# Altium PCB 24V-70A-Power-Board-v2.0.PcbDoc (part 6 of 9)
Units mm, origin at the board's own origin, x right, y up, seen from the top; angles counter-clockwise.
Board outline 350 x 215 mm, 2 copper layers (Top Layer, Bottom Layer), stack 1.64 mm thick; 337 components, 182 nets, 856 pads, 561 vias.
Unrouted connection lines stored in the file: 58.
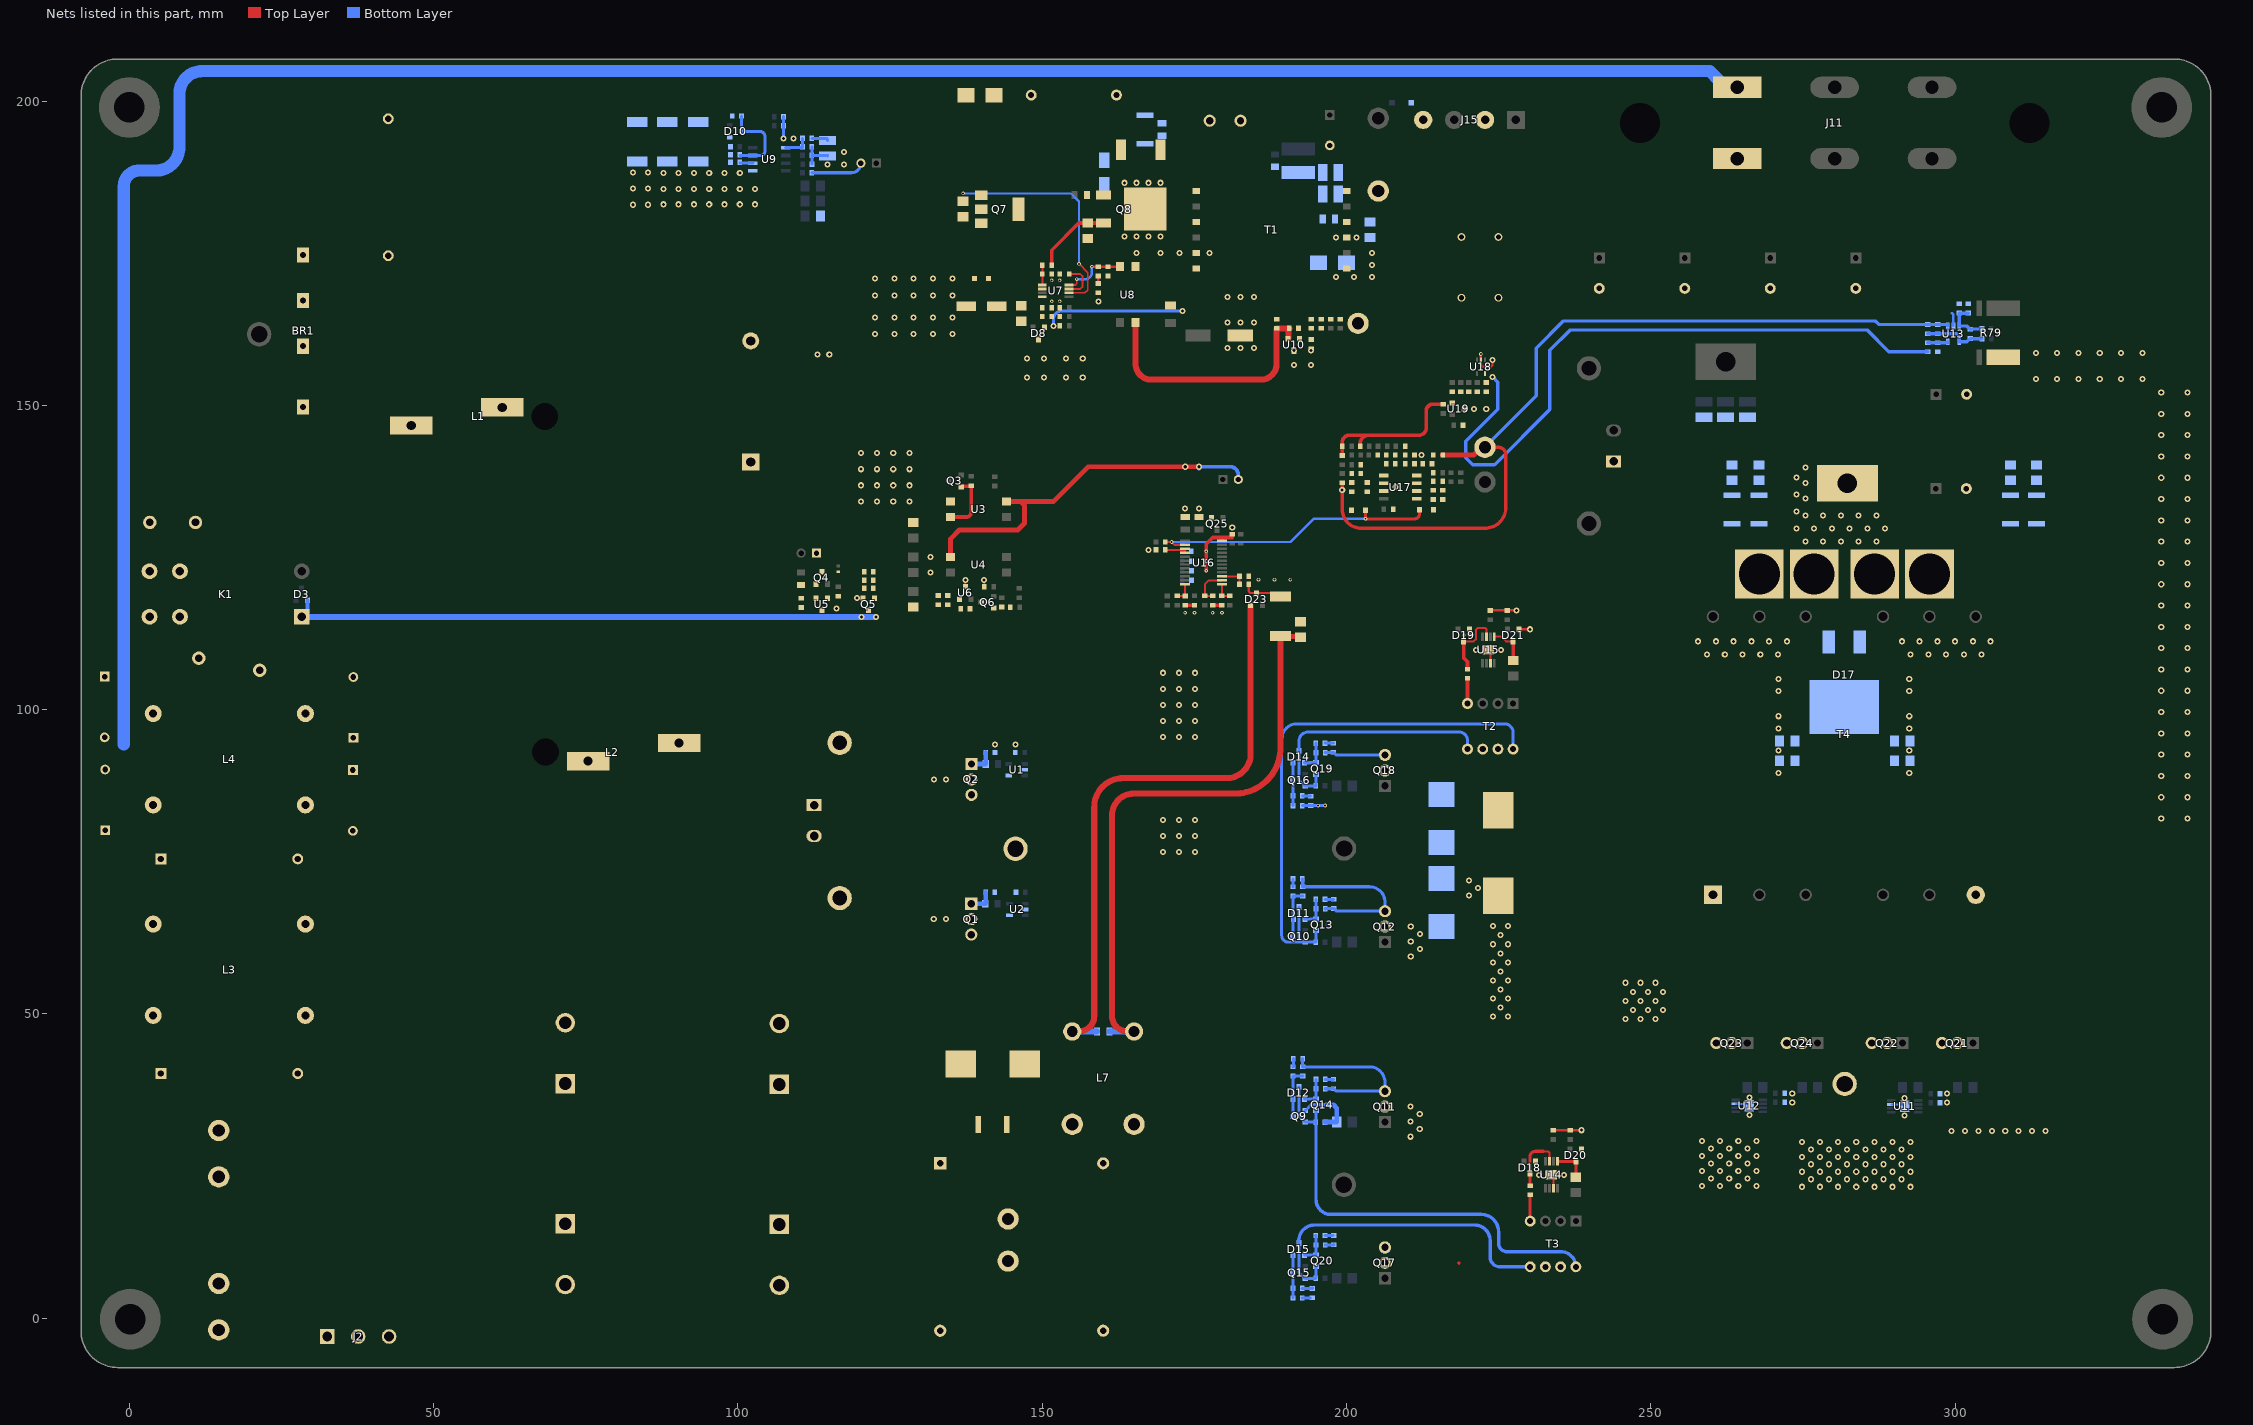
[diagram p2: the nets of this part, all layers, seen from the top]

## Part data (continued)
R103: library part RC1206JR-070RL, "RES 0 OHM JUMPER 1/4W 1206", Case Code (Imperial)=1206, Case Code (Metric)=3216, Manufacturer=Yageo, Max Operating Temperature=155°C, Max Power Dissipation=250mW, Min Operating Temperature=-55°C, Package Quantity=1, Resistance Tolerance=5%, Resistor Type="Thick Film,Carbon Film", Supplier Part Number=1414689, Temperature Coefficient=200ppm/°C, Voltage Rating=200V, Case/Package=1206, ComponentLink1Description=https://datasheet.ciiva.com/11808/0900766b80c6630a-11808156.pdf?src-supplier=Rs, ComponentLink1URL=https://datasheet.ciiva.com/11808/0900766b80c6630a-11808156.pdf?src-supplier=Rs, ComponentLink2Description=https://datasheet.ciiva.com/29181/402222-da-01-en-smd-widerstand-0-ohm-1206-29181568.pdf?src-supplier=Conrad, ComponentLink2URL=https://datasheet.ciiva.com/29181/402222-da-01-en-smd-widerstand-0-ohm-1206-29181568.pdf?src-supplier=Conrad, ComponentLink3Description=https://datasheet.ciiva.com/7983/444357-7983807.pdf?src-supplier=Element14, ComponentLink3URL=https://datasheet.ciiva.com/7983/444357-7983807.pdf?src-supplier=Element14, ComponentLink4Description=https://datasheet.ciiva.com/22747/1692832-22747541.pdf?src-supplier=Element14, ComponentLink4URL=https://datasheet.ciiva.com/22747/1692832-22747541.pdf?src-supplier=Element14, ComponentLink5Description=https://datasheet.ciiva.com/46445/444357-46445719.pdf?src-supplier=Element14, ComponentLink5URL=https://datasheet.ciiva.com/46445/444357-46445719.pdf?src-supplier=Element14, ComponentLink6Description=https://datasheet.ciiva.com/2458/pyu-rc1206-51-rohs-l-4-2458669.pdf?src-supplier=Digikey, ComponentLink6URL=https://datasheet.ciiva.com/2458/pyu-rc1206-51-rohs-l-4-2458669.pdf?src-supplier=Digikey, ComponentLink7Description=https://datasheet.ciiva.com/2458/pyu-rc1206-51-rohs-l-4-2458670.pdf?src-supplier=Digikey, ComponentLink7URL=https://datasheet.ciiva.com/2458/pyu-rc1206-51-rohs-l-4-2458670.pdf?src-supplier=Digikey, ComponentLink8Description=https://datasheet.ciiva.com/2458/pyu-rc1206-51-rohs-l-4-2458668.pdf?src-supplier=Digikey, ComponentLink8URL=https://datasheet.ciiva.com/2458/pyu-rc1206-51-rohs-l-4-2458668.pdf?src-supplier=Digikey, ComponentLink9Description=https://datasheet.ciiva.com/7857/1692832-7857422.pdf?src-supplier=Element14, ComponentLink9URL=https://datasheet.ciiva.com/7857/1692832-7857422.pdf?src-supplier=Element14, ComponentLink10Description=https://datasheet.ciiva.com/7857/1692832-7857421.pdf?src-supplier=Element14, ComponentLink10URL=https://datasheet.ciiva.com/7857/1692832-7857421.pdf?src-supplier=Element14, ComponentLink11Description=https://datasheet.ciiva.com/17035/pyu-rc1206-51-rohs-l-4-17035512.pdf?src-supplier=Future+Electronics, ComponentLink11URL=https://datasheet.ciiva.com/17035/pyu-rc1206-51-rohs-l-4-17035512.pdf?src-supplier=Future+Electronics, Contact Plating=Tin,Matte, Depth=1.6mm, Features="Moisture Resistant", Height=0.026inch, Item Type=Resistors, Lead Free=5697LeadFree, Length=0.122inch, Manufacturer Part Number=RC1206JR-070RL, Number of Terminations=2, Packaging="Tape and Reel", Power Rating=250mW, Pricing="5000=0.0025, 15000=0.0039, 25000=0.0023, 50000=0.0037, 100000=0.0022, 200000=0.0035, 250000=0.0021, 625000=0.002 (USD)", Reach SVHC Compliant=Unknown, RoHS=Yes, RoHS Compliant=Yes, Series=RC, Stock=1115000, Supplier="Future Electronics", Technology="THICK FILM", Termination=SMD/SMT, Tolerance=5%, Width=0.063inch
R104: library part CRCW060360K4FKEA, "RES SMD 60.4K OHM 1% 1/10W 0603", LCSC Part Number=C844800, Manufacturer=Vishay, Voltage Rating (DC)=75V, ComponentLink1Description=https://datasheet.ciiva.com/11809/0900766b80d98afc-11809685.pdf?src-supplier=Rs, ComponentLink1URL=https://datasheet.ciiva.com/11809/0900766b80d98afc-11809685.pdf?src-supplier=Rs, ComponentLink2Description=https://datasheet.ciiva.com/2494/dcrcwe3-2494471.pdf?src-supplier=Digikey, ComponentLink2URL=https://datasheet.ciiva.com/2494/dcrcwe3-2494471.pdf?src-supplier=Digikey, ComponentLink3Description=https://datasheet.ciiva.com/2494/dcrcwe3-2494472.pdf?src-supplier=Digikey, ComponentLink3URL=https://datasheet.ciiva.com/2494/dcrcwe3-2494472.pdf?src-supplier=Digikey, ComponentLink4Description=https://datasheet.ciiva.com/2494/dcrcwe3-2494473.pdf?src-supplier=Digikey, ComponentLink4URL=https://datasheet.ciiva.com/2494/dcrcwe3-2494473.pdf?src-supplier=Digikey, ComponentLink5Description=https://datasheet.ciiva.com/3257/dcrcwe3-3257786.pdf?src-supplier=Avnet, ComponentLink5URL=https://datasheet.ciiva.com/3257/dcrcwe3-3257786.pdf?src-supplier=Avnet, ComponentLink6Description=https://datasheet.ciiva.com/3257/dcrcwe3-3257787.pdf?src-supplier=Avnet, ComponentLink6URL=https://datasheet.ciiva.com/3257/dcrcwe3-3257787.pdf?src-supplier=Avnet, ComponentLink7Description=https://datasheet.ciiva.com/16391/dcrcwe3-16391304.pdf?src-supplier=Future+Electronics, ComponentLink7URL=https://datasheet.ciiva.com/16391/dcrcwe3-16391304.pdf?src-supplier=Future+Electronics, ComponentLink8Description=https://datasheet.ciiva.com/22676/1847332-22676330.pdf?src-supplier=Element14, ComponentLink8URL=https://datasheet.ciiva.com/22676/1847332-22676330.pdf?src-supplier=Element14, ComponentLink9Description=https://datasheet.ciiva.com/16760/70201119-16760503.pdf?src-supplier=Allied+Electronics, ComponentLink9URL=https://datasheet.ciiva.com/16760/70201119-16760503.pdf?src-supplier=Allied+Electronics, ComponentLink10Description=https://datasheet.ciiva.com/5545/dcrcwe3-109170-5545721.pdf?src-supplier=Mouser, ComponentLink10URL=https://datasheet.ciiva.com/5545/dcrcwe3-109170-5545721.pdf?src-supplier=Mouser, ComponentLink11Description=https://datasheet.ciiva.com/7816/1697337-7816053.pdf?src-supplier=Element14, ComponentLink11URL=https://datasheet.ciiva.com/7816/1697337-7816053.pdf?src-supplier=Element14, Item Type=Resistors, Lead Free=5697LeadFree, Manufacturer Part Number=CRCW060360K4FKEA, Pricing="1=0.1, 10=0.026, 50=0.0166, 100=0.014, 500=0.00954, 1000=0.00824 (USD)", RoHS=Yes, Stock=57146, Supplier=Digikey
R105: library part RC0603FR-0790K9L, "RES 90.9K OHM 1% 1/10W 0603", LCSC Part Number=C185305, Manufacturer=Yageo, Voltage Rating (DC)=50V, ComponentLink1Description=https://datasheet.ciiva.com/15189/getdatasheetpartid-325203-15189835.pdf?src-supplier=Verical, ComponentLink1URL=https://datasheet.ciiva.com/15189/getdatasheetpartid-325203-15189835.pdf?src-supplier=Verical, Item Type=Resistors, Lead Free=5697LeadFree, Manufacturer Part Number=RC0603FR-0790K9L, Pricing="5000=0.0022, 50000=0.0021, 150000=0.0021, 375000=0.002, 1000000=0.0019 (USD)", RoHS=Yes, RoHS Compliant=5897YesNo, Stock=100000, Supplier="Future Electronics"
R108: library part RC0603FR-07140KL, "RES 140K OHM 1% 1/10W 0603", LCSC Part Number=C185372, Manufacturer=Yageo, Voltage Rating (DC)=50V, ComponentLink1Description=https://datasheet.ciiva.com/2453/pyu-r-int-thick-7-2453916.pdf?src-supplier=Digikey, ComponentLink1URL=https://datasheet.ciiva.com/2453/pyu-r-int-thick-7-2453916.pdf?src-supplier=Digikey, ComponentLink2Description=https://datasheet.ciiva.com/2453/pyu-r-int-thick-7-2453917.pdf?src-supplier=Digikey, ComponentLink2URL=https://datasheet.ciiva.com/2453/pyu-r-int-thick-7-2453917.pdf?src-supplier=Digikey, ComponentLink3Description=https://datasheet.ciiva.com/2453/pyu-r-int-thick-7-2453918.pdf?src-supplier=Digikey, ComponentLink3URL=https://datasheet.ciiva.com/2453/pyu-r-int-thick-7-2453918.pdf?src-supplier=Digikey, Item Type=Resistor, Lead Free=5697LeadFree, Manufacturer Part Number=RC0603FR-07140KL, Pricing="5000=0.0015, 50000=0.0014, 150000=0.0014, 375000=0.0013, 1000000=0.0012 (USD)", RoHS=Yes, Stock=215000, Supplier="Future Electronics"
R109 R120: library part RT0603BRE07102KL, "RES SMD 102K OHM 0.1% 1/10W 0603", Case/Package=0603, LCSC Part Number=C861617, Manufacturer=Yageo, Max Operating Temperature=155°C, Max Power Dissipation=100mW, Min Operating Temperature=-55°C, Temperature Coefficient=50ppm/°C, Tolerance=0.1%, Voltage Rating (DC)=50V, ComponentLink1Description=https://datasheet.ciiva.com/2584/pyu-rt-1-to-0-05-rohs-l-5-2584160.pdf?src-supplier=Digikey, ComponentLink1URL=https://datasheet.ciiva.com/2584/pyu-rt-1-to-0-05-rohs-l-5-2584160.pdf?src-supplier=Digikey, ComponentLink2Description=https://datasheet.ciiva.com/8887/pyu-rt-1-to-0-05-rohs-l-4-8887854.pdf?src-supplier=Avnet, ComponentLink2URL=https://datasheet.ciiva.com/8887/pyu-rt-1-to-0-05-rohs-l-4-8887854.pdf?src-supplier=Avnet, Contact Plating=Tin,Matte, Item Type=Resistor, Lead Free="Lead Free", Manufacturer Part Number=RT0603BRE07102KL, Number of Terminations=2, Packaging="Tape and Reel", Pricing="5000=0.04446 (USD)", RoHS=Yes, RoHS Compliant=Yes, Series=RT, Supplier=Digikey
R110: library part CRCW0603150KFKEA, "RES 150K OHM 1% 1/10W 0603", Case Code (Imperial)=0603, Case Code (Metric)=1608, Manufacturer=Vishay, Max Operating Temperature=155°C, Max Power Dissipation=100mW, Min Operating Temperature=-55°C, Package Quantity=5000, Resistance Tolerance=1%, Resistor Type="Thick Film", Supplier Part Number=71-CRCW0603-150K-E3, Temperature Coefficient=100ppm/°C, Voltage Rating=75V, Case/Package=0603, ComponentLink1Description=https://datasheet.ciiva.com/11809/0900766b80d98afc-11809072.pdf?src-supplier=Rs, ComponentLink1URL=https://datasheet.ciiva.com/11809/0900766b80d98afc-11809072.pdf?src-supplier=Rs, ComponentLink2Description=https://datasheet.ciiva.com/7673/1697337-7673288.pdf?src-supplier=Element14, ComponentLink2URL=https://datasheet.ciiva.com/7673/1697337-7673288.pdf?src-supplier=Element14, ComponentLink3Description=https://datasheet.ciiva.com/16761/70201119-16761887.pdf?src-supplier=Allied+Electronics, ComponentLink3URL=https://datasheet.ciiva.com/16761/70201119-16761887.pdf?src-supplier=Allied+Electronics, ComponentLink4Description=https://datasheet.ciiva.com/5551/dcrcwe3-109170-5551862.pdf?src-supplier=Mouser, ComponentLink4URL=https://datasheet.ciiva.com/5551/dcrcwe3-109170-5551862.pdf?src-supplier=Mouser, ComponentLink5Description=https://datasheet.ciiva.com/3257/dcrcwe3-3257049.pdf?src-supplier=Avnet, ComponentLink5URL=https://datasheet.ciiva.com/3257/dcrcwe3-3257049.pdf?src-supplier=Avnet, ComponentLink6Description=https://datasheet.ciiva.com/16391/dcrcwe3-16391407.pdf?src-supplier=Future+Electronics, ComponentLink6URL=https://datasheet.ciiva.com/16391/dcrcwe3-16391407.pdf?src-supplier=Future+Electronics, ComponentLink7Description=https://datasheet.ciiva.com/15159/getdatasheetpartid-37540-15159436.pdf?src-supplier=Verical, ComponentLink7URL=https://datasheet.ciiva.com/15159/getdatasheetpartid-37540-15159436.pdf?src-supplier=Verical, Construction=Rectangular, Contact Plating=Tin, Depth=0.85mm, Features="Automotive AEC-Q200", Height=0.45mm, Item Type=Resistor, Lead Free=5697LeadFree, Length=1.55mm, Manufacturer Part Number=CRCW0603150KFKEA, Military Standard=Not, Number of Terminations=2, Packaging="Tape and Reel", Power Rating=100mW, Pricing="1=0.1, 10=0.017, 50=0.017, 100=0.01, 1000=0.008, 10000=0.004 (USD)", Reach SVHC Compliant=Unknown, RoHS=Yes, RoHS Compliant=Yes, Series=CRCW, Stock=73041, Supplier=Mouser, Technology="THICK FILM", Termination=SMD/SMT, Tolerance=1%, Voltage Rating (DC)=75V, Weight=7.1E-05oz, Width=0.85mm
R111: library part RT0603BRD0728KL, "RES SMD 28K OHM 0.1% 1/10W 0603", LCSC Part Number=C705756, Manufacturer=Yageo, ComponentLink1Description=http://www.mouser.com/ds/2/447/yageodocoutput-1125656.pdf?src-supplier=Mouser, ComponentLink1URL=http://www.mouser.com/ds/2/447/yageodocoutput-1125656.pdf?src-supplier=Mouser, ComponentLink2Description=https://datasheet.octopart.com/RT0603BRD0728KL-Yageo-datasheet-166250672.pdf?src-supplier=Future+Electronics, ComponentLink2URL=https://datasheet.octopart.com/RT0603BRD0728KL-Yageo-datasheet-166250672.pdf?src-supplier=Future+Electronics, ComponentLink3Description=https://www.yageo.com/upload/media/product/productsearch/datasheet/rchip/PYu-RT_1-to-0.01_RoHS_L_12.pdf?src-supplier=Digikey, ComponentLink3URL=https://www.yageo.com/upload/media/product/productsearch/datasheet/rchip/PYu-RT_1-to-0.01_RoHS_L_12.pdf?src-supplier=Digikey, ComponentLink4Description=http://www.yageo.com/documents/recent/PYu-RT_1-to-0.01_RoHS_L_9.pdf?src-supplier=Digikey, ComponentLink4URL=http://www.yageo.com/documents/recent/PYu-RT_1-to-0.01_RoHS_L_9.pdf?src-supplier=Digikey, ComponentLink5Description=http://www.yageo.com/documents/recent/PYu-RT_1-to-0.05_RoHS_L_6.pdf?src-supplier=Avnet, ComponentLink5URL=http://www.yageo.com/documents/recent/PYu-RT_1-to-0.05_RoHS_L_6.pdf?src-supplier=Avnet, Item Type=Resistors, Manufacturer Part Number=RT0603BRD0728KL, Pricing="1=0.14, 10=0.106, 50=0.0846, 100=0.0755, 500=0.05814, 1000=0.051 (USD)", RoHS=Yes, Stock=2021, Supplier=Digikey
R113: library part RT0603BRD0727K4L, "RES SMD 27.4KOHM 0.1% 1/10W 0603", LCSC Part Number=C861274, Manufacturer=Yageo, ComponentLink1Description=https://datasheet.ciiva.com/8889/pyu-rt-1-to-0-05-rohs-l-4-8889871.pdf?src-supplier=Avnet, ComponentLink1URL=https://datasheet.ciiva.com/8889/pyu-rt-1-to-0-05-rohs-l-4-8889871.pdf?src-supplier=Avnet, ComponentLink2Description=https://datasheet.ciiva.com/12724/pyu-rt-1-to-0-05-rohs-l-4-12724007.pdf?src-supplier=Mouser, ComponentLink2URL=https://datasheet.ciiva.com/12724/pyu-rt-1-to-0-05-rohs-l-4-12724007.pdf?src-supplier=Mouser, Item Type=Resistors, Manufacturer Part Number=RT0603BRD0727K4L, Pricing="5000=0.0277, 15000=0.0267, 25000=0.0262, 50000=0.0256, 100000=0.0247 (USD)", RoHS=Yes, Stock=5000, Supplier="Future Electronics"
R118: library part CRCW06034K75FKEA, "RES SMD 4.75K OHM 1% 1/10W 0603", LCSC Part Number=C844570, Manufacturer=Vishay, Voltage Rating (DC)=75V, ComponentLink1Description=https://datasheet.ciiva.com/11810/0900766b80d98afc-11810668.pdf?src-supplier=Rs, ComponentLink1URL=https://datasheet.ciiva.com/11810/0900766b80d98afc-11810668.pdf?src-supplier=Rs, ComponentLink2Description=https://datasheet.ciiva.com/16754/70201119-16754725.pdf?src-supplier=Allied+Electronics, ComponentLink2URL=https://datasheet.ciiva.com/16754/70201119-16754725.pdf?src-supplier=Allied+Electronics, ComponentLink3Description=https://datasheet.ciiva.com/16199/dcrcwe3-16199173.pdf?src-supplier=Future+Electronics, ComponentLink3URL=https://datasheet.ciiva.com/16199/dcrcwe3-16199173.pdf?src-supplier=Future+Electronics, ComponentLink4Description=https://datasheet.ciiva.com/22707/1697337-22707751.pdf?src-supplier=Element14, ComponentLink4URL=https://datasheet.ciiva.com/22707/1697337-22707751.pdf?src-supplier=Element14, ComponentLink5Description=https://datasheet.ciiva.com/7690/1697337-7690725.pdf?src-supplier=Element14, ComponentLink5URL=https://datasheet.ciiva.com/7690/1697337-7690725.pdf?src-supplier=Element14, ComponentLink6Description=https://datasheet.ciiva.com/7690/1697337-7690726.pdf?src-supplier=Element14, ComponentLink6URL=https://datasheet.ciiva.com/7690/1697337-7690726.pdf?src-supplier=Element14, ComponentLink7Description=https://datasheet.ciiva.com/16788/70201119-16788508.pdf?src-supplier=Allied+Electronics, ComponentLink7URL=https://datasheet.ciiva.com/16788/70201119-16788508.pdf?src-supplier=Allied+Electronics, ComponentLink8Description=https://datasheet.ciiva.com/3257/dcrcwe3-3257669.pdf?src-supplier=Avnet, ComponentLink8URL=https://datasheet.ciiva.com/3257/dcrcwe3-3257669.pdf?src-supplier=Avnet, ComponentLink9Description=https://datasheet.ciiva.com/5541/dcrcwe3-109170-5541322.pdf?src-supplier=Mouser, ComponentLink9URL=https://datasheet.ciiva.com/5541/dcrcwe3-109170-5541322.pdf?src-supplier=Mouser, Item Type=Resistors, Lead Free=5697LeadFree, Manufacturer Part Number=CRCW06034K75FKEA, Pricing="1=0.1, 10=0.017, 50=0.017, 100=0.01, 1000=0.008, 10000=0.004 (USD)", RoHS=Yes, Stock=103605, Supplier=Mouser
RT1: "ICL 10 OHM 20% 8A 26MM", Manufacturer="TDK EPCOS", Supplier Part Number=495-4111-ND, ComponentLink1Description=https://datasheet.ciiva.com/46435/1795241-46435759.pdf?src-supplier=Element14, ComponentLink1URL=https://datasheet.ciiva.com/46435/1795241-46435759.pdf?src-supplier=Element14, ComponentLink2Description=https://datasheet.ciiva.com/7982/1795241-7982525.pdf?src-supplier=Element14, ComponentLink2URL=https://datasheet.ciiva.com/7982/1795241-7982525.pdf?src-supplier=Element14, Item Type=THermistor, Manufacturer Part Number=B57464S0100M000, Pricing="1=5.3, 5=4.42, 10=4.087, 50=3.4022, 200=2.9015, 400=2.6778, 600=2.5544, 1000=2.50812 (USD)", RoHS=Yes, Supplier=Digikey
T1: "XFMR FLYBACK AC/DC CONV 2MH TH", Manufacturer="Wurth Electronics", Supplier Part Number=732-7508111323CT-ND, Item Type=Transformer, Manufacturer Part Number=7508111323, Pricing="1=6.34, 25=6.3092, 50=5.735 (USD)", RoHS=No, Stock=130, Supplier=Digikey
T2 T3: "Gate Drive Transformer", LCSC Part Number=-, Manufacturer=Vitec, Manufacturer Part Number=56P3362, Package=Custom, ComponentLink1Description=LCSC, Item Type=Transformer
T4: LCSC Part Number=-, Manufacturer="Texas Instruments", Package=Custom, ComponentLink1Description=Supplier, ComponentLink1URL=https://www.bourns.com/products/magnetic-products/kaschke-components, Item Type=Transformer, Manufacturer Part Number="PQ50-50 145400-A"
U1 U2: "IC GATE DRVR LOW-SIDE SOT23-5", Case/Package=SOT-23-5, LCSC Part Number=C99395, Manufacturer="Texas Instruments", Max Operating Temperature=140°C, Max Output current=4A, Max Supply Voltage=18V, Min Operating Temperature=-40°C, Min Supply Voltage=4.5V, Operating Supply Voltage=12V, Package Quantity=3000, Channel Type=Single, ComponentLink1Description=http://components.arrow.com/part/dataview/52526194S5756N7713?src-supplier=Arrow+Electronics, ComponentLink1URL=http://components.arrow.com/part/dataview/52526194S5756N7713?src-supplier=Arrow+Electronics, ComponentLink2Description=http://www.ti.com/lit/ds/symlink/ucc27517.pdf?src-supplier=Avnet, ComponentLink2URL=http://www.ti.com/lit/ds/symlink/ucc27517.pdf?src-supplier=Avnet, ComponentLink3Description=http://www.ti.com/lit/ds/symlink/ucc27517.pdf?src-supplier=Digikey, ComponentLink3URL=http://www.ti.com/lit/ds/symlink/ucc27517.pdf?src-supplier=Digikey, ComponentLink4Description=http://www.ti.com/lit/gpn/ucc27517?src-supplier=Mouser, ComponentLink4URL=http://www.ti.com/lit/gpn/ucc27517?src-supplier=Mouser, ComponentLink5Description=http://www.ti.com/general/docs/lit/getliterature.tsp?genericPartNumber=UCC27516&&fileType=pdf&src-supplier=Avnet, ComponentLink5URL=http://www.ti.com/general/docs/lit/getliterature.tsp?genericPartNumber=UCC27516&&fileType=pdf&src-supplier=Avnet, ComponentLink6Description=https://www.verical.com/server-webapp/html/getDatasheet?partID=482756&src-supplier=Verical, ComponentLink6URL=https://www.verical.com/server-webapp/html/getDatasheet?partID=482756&src-supplier=Verical, Fall Time=11ns, Height=1.45mm, Item Type=IC, Lead Free="Lead Free", Length=2.9mm, Manufacturer Part Number=UCC27517DBVR, Mounting Technology="Surface Mount", Number of Channels=1, Number of Drivers=1, Number of Outputs=1, Output Current=4A, Packaging="Tape and Reel", Pins=5, Pricing="1=0.77, 10=0.646, 50=0.646, 100=0.501, 1000=0.346, 10000=0.29 (USD)", Propagation Delay=30ns, Radiation Hardening=No, Rise Time=22ns, RoHS=Yes, RoHS Compliant=Yes, Series=-, Stock=71094, Supplier=Mouser, Thickness=1.2mm, Turn-On Delay Time=30ns, Width=1.6mm
U3 U4 U8: "OPTOISOLATOR 5KV TRANSISTOR 4SMD", LCSC Part Number=C241832, Manufacturer="ON Semiconductor / Fairchild", ComponentLink1Description=https://datasheet.ciiva.com/2085/fod817-2085872.pdf?src-supplier=Digikey, ComponentLink1URL=https://datasheet.ciiva.com/2085/fod817-2085872.pdf?src-supplier=Digikey, ComponentLink2Description=https://datasheet.ciiva.com/30520/2018343-30520890.pdf?src-supplier=Jameco, ComponentLink2URL=https://datasheet.ciiva.com/30520/2018343-30520890.pdf?src-supplier=Jameco, ComponentLink3Description=https://datasheet.ciiva.com/15118/getdatasheetpartid-110546-15118613.pdf?src-supplier=Verical, ComponentLink3URL=https://datasheet.ciiva.com/15118/getdatasheetpartid-110546-15118613.pdf?src-supplier=Verical, ComponentLink4Description=https://datasheet.ciiva.com/2085/fod817d-2085873.pdf?src-supplier=Digikey, ComponentLink4URL=https://datasheet.ciiva.com/2085/fod817d-2085873.pdf?src-supplier=Digikey, ComponentLink5Description=https://datasheet.ciiva.com/2085/fod817d-2085874.pdf?src-supplier=Digikey, ComponentLink5URL=https://datasheet.ciiva.com/2085/fod817d-2085874.pdf?src-supplier=Digikey, ComponentLink6Description=https://datasheet.ciiva.com/8095/fod817d-8095134.pdf?src-supplier=Avnet, ComponentLink6URL=https://datasheet.ciiva.com/8095/fod817d-8095134.pdf?src-supplier=Avnet, ComponentLink7Description=https://datasheet.ciiva.com/17277/fod817-17277350.pdf?src-supplier=Future+Electronics, ComponentLink7URL=https://datasheet.ciiva.com/17277/fod817-17277350.pdf?src-supplier=Future+Electronics, Item Type=Optocouplers, Manufacturer Part Number=FOD817DSD, Pricing="1000=0.153, 3000=0.148, 5000=0.146, 15000=0.142, 25000=0.138 (USD)", RoHS=Yes, Stock=194000, Supplier="Future Electronics"
U5 U19: "IC VREF SHUNT ADJ 1% SOT23-3", Case/Package=SOT-23, Cathode Current=700uA, LCSC Part Number=C23892, Manufacturer="Texas Instruments", Max Operating Temperature=125°C, Max Output current=100mA, Max Output Voltage=36V, Max Supply Voltage=37V, Min Input Voltage=2.495V, Min Operating Temperature=-40°C, Package Quantity=1, Temperature Coefficient=92ppm/°C, Tolerance=1%, ComponentLink1Description=https://datasheet.ciiva.com/3235/tl432b-3235600.pdf?src-supplier=Avnet, ComponentLink1URL=https://datasheet.ciiva.com/3235/tl432b-3235600.pdf?src-supplier=Avnet, ComponentLink2Description=https://datasheet.ciiva.com/15148/getdatasheetpartid-171576-15148968.pdf?src-supplier=Verical, ComponentLink2URL=https://datasheet.ciiva.com/15148/getdatasheetpartid-171576-15148968.pdf?src-supplier=Verical, ComponentLink3Description=https://datasheet.ciiva.com/41462/001014548-da-01-en-ic-vref-shunt-prec-tl431aidbzr-sot-3-tid-41462400.pdf?src-supplier=Conrad, ComponentLink3URL=https://datasheet.ciiva.com/41462/001014548-da-01-en-ic-vref-shunt-prec-tl431aidbzr-sot-3-tid-41462400.pdf?src-supplier=Conrad, ComponentLink4Description=https://datasheet.ciiva.com/46397/1887475-46397705.pdf?src-supplier=Element14, ComponentLink4URL=https://datasheet.ciiva.com/46397/1887475-46397705.pdf?src-supplier=Element14, ComponentLink5Description=https://datasheet.ciiva.com/2006/tl431a-2006188.pdf?src-supplier=Digikey, ComponentLink5URL=https://datasheet.ciiva.com/2006/tl431a-2006188.pdf?src-supplier=Digikey, ComponentLink6Description=https://datasheet.ciiva.com/2006/tl431a-2006187.pdf?src-supplier=Digikey, ComponentLink6URL=https://datasheet.ciiva.com/2006/tl431a-2006187.pdf?src-supplier=Digikey, ComponentLink7Description=https://datasheet.ciiva.com/2006/tl431a-2006189.pdf?src-supplier=Digikey, ComponentLink7URL=https://datasheet.ciiva.com/2006/tl431a-2006189.pdf?src-supplier=Digikey, Item Type=IC, Lead Free="Lead Free", Manufacturer Part Number=TL431AIDBZR, Min Output Voltage=2.495V, Number of Channels=1, Output Current=100mA, Output Type=Adjustable, Output Voltage=36V, Packaging="Tape and Reel", Pins=3, Pricing="1=0.25, 10=0.142, 50=0.142, 100=0.099, 1000=0.095, 10000=0.08 (USD)", Radiation Hardening=No, Reach SVHC Compliant=No, Reference Type=Shunt,Adjustable, Reference Voltage=36V, RoHS=Yes, RoHS Compliant=Yes, Series=-, Stock=732677, Supplier=Mouser
U6 U10: "IC VREF SHUNT ADJ 1% SOT23-3", LCSC Part Number=C478069, Manufacturer="TI National Semiconductor", ComponentLink1Description=https://datasheet.ciiva.com/2012/lmv431-2012949.pdf?src-supplier=Digikey, ComponentLink1URL=https://datasheet.ciiva.com/2012/lmv431-2012949.pdf?src-supplier=Digikey, ComponentLink2Description=https://datasheet.ciiva.com/2012/lmv431-2012950.pdf?src-supplier=Digikey, ComponentLink2URL=https://datasheet.ciiva.com/2012/lmv431-2012950.pdf?src-supplier=Digikey, ComponentLink3Description=https://datasheet.ciiva.com/6596/lmv431-6596021.pdf?src-supplier=Digikey, ComponentLink3URL=https://datasheet.ciiva.com/6596/lmv431-6596021.pdf?src-supplier=Digikey, ComponentLink4Description=https://datasheet.ciiva.com/46424/1841927-46424699.pdf?src-supplier=Element14, ComponentLink4URL=https://datasheet.ciiva.com/46424/1841927-46424699.pdf?src-supplier=Element14, Item Type=IC, Manufacturer Part Number=LMV431AIMFX/NOPB, Pricing="1=0.68, 10=0.561, 50=0.561, 100=0.425, 1000=0.29, 10000=0.24 (USD)", RoHS=Yes, Stock=22360, Supplier=Mouser
U7: "IC OFFLINE SWITCH FLYBACK 8VSSOP", Case/Package=VSSOP, Frequency=130kHz, LCSC Part Number=C2871051, Manufacturer="Texas Instruments", Max Operating Temperature=125°C, Max Supply Voltage=14V, Min Operating Temperature=-40°C, Min Supply Voltage=8V, Nominal Supply Current=800uA, Package Quantity=1000, ComponentLink1Description=https://datasheet.ciiva.com/23940/1752268-23940537.pdf?src-supplier=Newark, ComponentLink1URL=https://datasheet.ciiva.com/23940/1752268-23940537.pdf?src-supplier=Newark, ComponentLink2Description=https://datasheet.ciiva.com/30018/lm5023-30018293.pdf?src-supplier=Avnet, ComponentLink2URL=https://datasheet.ciiva.com/30018/lm5023-30018293.pdf?src-supplier=Avnet, ComponentLink3Description=https://datasheet.ciiva.com/22748/1804927-22748090.pdf?src-supplier=Element14, ComponentLink3URL=https://datasheet.ciiva.com/22748/1804927-22748090.pdf?src-supplier=Element14, ComponentLink4Description=https://datasheet.ciiva.com/29610/lm5023-29610235.pdf?src-supplier=Digikey, ComponentLink4URL=https://datasheet.ciiva.com/29610/lm5023-29610235.pdf?src-supplier=Digikey, ComponentLink5Description=https://datasheet.ciiva.com/29610/lm5023-29610236.pdf?src-supplier=Digikey, ComponentLink5URL=https://datasheet.ciiva.com/29610/lm5023-29610236.pdf?src-supplier=Digikey, ComponentLink6Description=https://datasheet.ciiva.com/18617/lm5023-18617703.pdf?src-supplier=Digikey, ComponentLink6URL=https://datasheet.ciiva.com/18617/lm5023-18617703.pdf?src-supplier=Digikey, ComponentLink7Description=https://datasheet.ciiva.com/30018/lm5023-30018294.pdf?src-supplier=Avnet, ComponentLink7URL=https://datasheet.ciiva.com/30018/lm5023-30018294.pdf?src-supplier=Avnet, Duty Cycle=0%, Fall Time=15ns, Fault Protection="Over Voltage", Height=1.07mm, Item Type=IC, Lead Free="Lead Free", Length=3mm, Manufacturer Part Number=LM5023MM-2/NOPB, Max Duty Cycle=50%, Mounting Technology="Surface Mount", Number of Outputs=1, Operating Supply Current=800uA, Packaging="Cut Tape", Pins=8, Pricing="1=1.17, 10=0.891, 50=0.891, 100=0.811, 1000=0.643, 10000=0.627 (USD)", Radiation Hardening=No, Reach SVHC Compliant=No, Rise Time=25ns, RoHS=Yes, RoHS Compliant=Yes, Series=-, Stock=1589, Supplier=Mouser, Switching Frequency=130kHz, Thickness=970um, Topology=Flyback, Width=3mm
U9: "IC PFC CTRLR CCM 250KHZ 8SOIC", LCSC Part Number=C88567, Manufacturer="Texas Instruments", ComponentLink1Description=https://datasheet.ciiva.com/24141/slusbq5a-317155-24141395.pdf?src-supplier=Mouser, ComponentLink1URL=https://datasheet.ciiva.com/24141/slusbq5a-317155-24141395.pdf?src-supplier=Mouser, ComponentLink2Description=https://datasheet.ciiva.com/29899/ucc28180-29899377.pdf?src-supplier=Avnet, ComponentLink2URL=https://datasheet.ciiva.com/29899/ucc28180-29899377.pdf?src-supplier=Avnet, Item Type=IC, Manufacturer Part Number=UCC28180DR, Pricing="1=1.44, 10=1.29, 50=1.29, 100=1.01, 1000=0.66, 10000=0.563 (USD)", RoHS=Yes, Stock=6340, Supplier=Mouser
U11 U12 U14 U15: "IC GATE DRVR LOW-SIDE 8MSOP", Manufacturer="Texas Instruments", Supplier Part Number=595-UCC27524DGN, ComponentLink1Description=https://datasheet.ciiva.com/15110/getdatasheetpartid-551635-15110694.pdf?src-supplier=Verical, ComponentLink1URL=https://datasheet.ciiva.com/15110/getdatasheetpartid-551635-15110694.pdf?src-supplier=Verical, ComponentLink2Description=https://datasheet.ciiva.com/7977/1806027-7977576.pdf?src-supplier=Element14, ComponentLink2URL=https://datasheet.ciiva.com/7977/1806027-7977576.pdf?src-supplier=Element14, ComponentLink3Description=https://datasheet.ciiva.com/6614/ucc27524-6614166.pdf?src-supplier=Digikey, ComponentLink3URL=https://datasheet.ciiva.com/6614/ucc27524-6614166.pdf?src-supplier=Digikey, ComponentLink4Description=https://datasheet.ciiva.com/14266/ucc27523-14266646.pdf?src-supplier=Avnet, ComponentLink4URL=https://datasheet.ciiva.com/14266/ucc27523-14266646.pdf?src-supplier=Avnet, Item Type=IC, Manufacturer Part Number=UCC27524DGN, Pricing="1=2.55, 10=1.85, 50=1.85, 100=1.41, 1000=1.25, 10000=1.05 (USD)", RoHS=Yes, Stock=6831, Supplier=Mouser
U13: "IC OPAMP ZER-DRIFT 1CIRC SOT23-5", Manufacturer="Texas Instruments", ComponentLink1Description=https://datasheet.ciiva.com/14463/sbos417d-14463248.pdf?src-supplier=Avnet, ComponentLink1URL=https://datasheet.ciiva.com/14463/sbos417d-14463248.pdf?src-supplier=Avnet, ComponentLink2Description=https://datasheet.ciiva.com/1813/opa2378-1813508.pdf?src-supplier=Digikey, ComponentLink2URL=https://datasheet.ciiva.com/1813/opa2378-1813508.pdf?src-supplier=Digikey, Item Type=IC, Manufacturer Part Number=OPA378AIDBVR, Pricing="1=1.96, 10=1.35, 50=1.35, 100=1.18, 1000=0.992, 10000=0.911 (USD)", RoHS=Yes, Stock=1753, Supplier=Mouser
U16: "PWR MGMT MOSFET/PWR DRIVER", Case/Package=TSSOP, LCSC Part Number=C1849524, Manufacturer="Texas Instruments", Max Operating Temperature=125°C, Min Operating Temperature=-40°C, Switching Frequency=1MHz, Clock Sync=Yes, ComponentLink1Description=http://www.ti.com/general/docs/suppproductinfo.tsp?distId=10&amp;gotoUrl=http%3A%2F%2Fwww.ti.com%2Flit%2Fgpn%2Fucc28951&src-supplier=Digikey, ComponentLink1URL=http://www.ti.com/general/docs/suppproductinfo.tsp?distId=10&amp;gotoUrl=http%3A%2F%2Fwww.ti.com%2Flit%2Fgpn%2Fucc28951&src-supplier=Digikey, Item Type=IC, Manufacturer Part Number=UCC28951PWR, Max Duty Cycle=95%, Number of Output Phases=1, Number of Outputs=6, Output Configuration=Positive, Packaging="Tape and Reel", Pricing="1=6.18, 10=4.19, 50=4.19, 100=3.75, 1000=3.27, 10000=2.88 (USD)", RoHS=Yes, RoHS Compliant=Yes, Series=-, Stock=2468, Supplier=Mouser, Synchronous Rectifier=Yes
U17: "IC CMOS 2 CIRCUIT 8SOIC", Case/Package=D, Input Bias Current=60pA, Input Offset Voltage (Vos)=10mV, LCSC Part Number=C9374, Manufacturer="Texas Instruments", Max Operating Temperature=85°C, Max Supply Voltage=16V, Min Operating Temperature=-40°C, Min Supply Voltage=3V, Operating Supply Current=1.9mA, Output Current per Channel=30mA, Package Quantity=1, Power Dissipation=725mW, Supply Current=4mA, Voltage Gain=87.23dB, Amplifier Type="GENERAL PURPOSE", Bandwidth=1.7MHz, Common Mode Rejection Ratio=65dB, ComponentLink1Description=https://datasheet.ciiva.com/46392/1831142-46392281.pdf?src-supplier=Element14, ComponentLink1URL=https://datasheet.ciiva.com/46392/1831142-46392281.pdf?src-supplier=Element14, ComponentLink2Description=https://datasheet.ciiva.com/1797/tlc272a-1797237.pdf?src-supplier=Digikey, ComponentLink2URL=https://datasheet.ciiva.com/1797/tlc272a-1797237.pdf?src-supplier=Digikey, ComponentLink3Description=https://datasheet.ciiva.com/1797/tlc272a-1797236.pdf?src-supplier=Digikey, ComponentLink3URL=https://datasheet.ciiva.com/1797/tlc272a-1797236.pdf?src-supplier=Digikey, ComponentLink4Description=https://datasheet.ciiva.com/1797/tlc272a-1797238.pdf?src-supplier=Digikey, ComponentLink4URL=https://datasheet.ciiva.com/1797/tlc272a-1797238.pdf?src-supplier=Digikey, ComponentLink5Description=https://datasheet.ciiva.com/14456/tlc277-14456667.pdf?src-supplier=Avnet, ComponentLink5URL=https://datasheet.ciiva.com/14456/tlc277-14456667.pdf?src-supplier=Avnet, Gain Bandwidth Product=1.7MHz, Height=1.58mm, Item Type=IC, Lead Free="Lead Free", Length=4.9mm, Manufacturer Part Number=TLC272CDR, Max I/O Voltage=10mV, Nominal Gain Bandwidth Product=1.7MHz, Number of Amplifiers=2, Number of Channels=2, Number of Circuits=2, Number of Elements=2, Packaging="Tape and Reel", Pins=8, Pricing="1=1.37, 10=0.858, 50=0.858, 100=0.691, 1000=0.631, 10000=0.519 (USD)", Radiation Hardening=No, Reach SVHC Compliant=No, RoHS=Yes, RoHS Compliant=Yes, Series=LinCMOS™, Slew Rate=3.6V/µs, Stock=26547, Supplier=Mouser, Thickness=1.58mm, Unity Gain Bandwidth Product=1.7MHz, Width=3.91mm
U18: "IC REG LINEAR 3.45V 50MA SC70-5", LCSC Part Number=C473350, Manufacturer="Texas Instruments", ComponentLink1Description=https://datasheet.ciiva.com/7992/1854688-7992974.pdf?src-supplier=Element14, ComponentLink1URL=https://datasheet.ciiva.com/7992/1854688-7992974.pdf?src-supplier=Element14, Item Type=IC, Manufacturer Part Number=TPS715345DCKR, Number of Channels=1NUMBER, Pricing="1=0.53, 10=0.394, 50=0.394, 100=0.335, 1000=0.302, 10000=0.277 (USD)", RoHS=Yes, Stock=16749, Supplier=Mouser, Thickness=900um
VR1: "VARISTOR 430V 10KA DISC 20MM", Case/Package=Metal, Clamping Current=100A, Clamping Voltage=710V, Flammability Rating=5813Flammability, LCSC Part Number=C210767, Manufacturer="TDK EPCOS", Max Operating Temperature=85°C, Max Output current=8kA, Max Surge Current=10kA, Max Varistor Voltage=473V, Max Voltage Rating (AC)=275V, Max Voltage Rating (DC)=350V, Min Operating Temperature=-40°C, Min Varistor Voltage=387V, Power Rating=1W, Varistor Voltage=430V, Voltage Tolerance=10%, ComponentLink1Description=https://datasheet.ciiva.com/28408/1680955-28408747.pdf?src-supplier=Element14, ComponentLink1URL=https://datasheet.ciiva.com/28408/1680955-28408747.pdf?src-supplier=Element14, ComponentLink2Description=https://datasheet.ciiva.com/16417/siov-leaded-advanced-16417989.pdf?src-supplier=Future+Electronics, ComponentLink2URL=https://datasheet.ciiva.com/16417/siov-leaded-advanced-16417989.pdf?src-supplier=Future+Electronics, Depth=5.8mm, Energy=215J, Item Type=Varistors, Lead Free=5697LeadFree, Lead Pitch=10mm, Lead/Base Style=Radial, Manufacturer Part Number=B72220S2271K101, Material=4240ConductorMaterial, Mounting Technology="Through Hole", Number of Circuits=1, Packaging=Bulk, Pricing="1=1.43, 10=0.901, 25=0.7632, 100=0.6065, 250=0.53008, 500=0.4833, 1000=0.44435, 2500=0.40274, 5000=0.37737 (USD)", Radiation Hardening=5898YesNo, Reach SVHC Compliant=Unknown, RoHS=Yes, RoHS Compliant=Yes, Series=AdvanceD, Stock=13458, Supplier=Digikey, Termination=4745ConnectorType, Voltage Rating=350V, Voltage Rating (AC)=275V, Voltage Rating (DC)=350V, Weight=4.000004g

## Free pads (board coordinates)
  round 10 hole 5: MH(0,198.967) MH(0.148,-0.148) MH(333.967,198.967) MH(334.115,-0.148)

## Via types
v1: diameter 1, hole 0.5, Top Layer to Bottom Layer, 506 vias
v2: diameter 0.6, hole 0.3, Top Layer to Bottom Layer, 35 vias
v3: diameter 1, hole 0.5, Top Layer to Bottom Layer, tented both sides, 16 vias
v4: diameter 0.6, hole 0.3, Top Layer to Bottom Layer, tented both sides, 4 vias

## Nets (pads, with @x,y where several pads share a name; then routed paths per layer and width w, separated by ;. In a path a pad name is that pad's centre, name@x,y a point inside that pad or via, vN(x,y) a via of type N, cw(c..) or ccw(c..) an arc to the next point about the centre after c; other vN are vias at no path point)
+3V45: C98.2 R81.1 U18.5 | length 108.6
  Bottom Layer w0.559: v3(224,154.703) 224.888,153.815 224.888,149.399 219.623,144.133 219.623,141.379 220.742,140.26 224.33,140.26 233.404,149.335 233.404,159.046 236.752,162.394 285.548,162.394 289.141,158.801 R81.1@295.504,158.801
+5Vref: R107.2 R113.2 R114.2 R115.1 R118.2 U19.1 | length 26.1
  Top Layer w0.6: R113.2@199.301,141.783 199.301,143.281 R118.2@199.314,143.281 199.314,143.967 cw(c200.457,143.967) 200.457,145.11 203.632,145.11 ; R107.2@202.245,143.281 202.245,143.724 cw(c203.632,143.724) 203.632,145.11 ; R114.2@215.871,150.205 214.198,150.205 ccw(c214.198,149.113) 213.106,149.113 213.106,146.304 cw(c211.912,146.304) 211.912,145.11 203.632,145.11
+390V: C3.1 C4.1 C5.1 C6.1 C11.1 D1.1 D2.1 J1.1 L6.1 R15.2 R28.2 R49.1
  other v3: 113.106,158.344 115.011,158.344
AC_L: J2.1 J3.1
AC_N: C7.2 J2.3 L3.2
ADEL: R87.1 R98.2 U16.14 | length 6.3
  Top Layer w0.35: R98.2@178.003,118.702 R87.1@176.733,118.702 176.733,120.618 177.378,121.263 U16.14@179.536,121.263
ADELEF: R88.1 R99.2 U16.13 | length 3.2
  Top Layer w0.35: U16.13@179.536,120.613 R99.2@179.536,118.702 R88.1@180.848,118.702
CT+: D23.1 L7.1 R48.2 | length 98.6
  Top Layer w1: L7.1@154.94,47.117 156.017,47.117 ccw(c156.017,49.657) 158.557,49.657 158.557,84.025 cw(c163.28,84.025) 163.28,88.748 180.27,88.748 ccw(c180.27,92.741) 184.263,92.741 D23.1@184.263,117.159
  Bottom Layer w1: L7.1@154.94,47.117 R48.2@159.004,47.117
CT-: L7.4 R48.1 R102.2 R103.1 | length 97.8
  Top Layer w0.762: R102.2@189.247,112.022 192.363,112.022 R103.1@192.456,111.929
  Top Layer w1: L7.4@165.1,47.117 164.023,47.117 cw(c164.023,49.657) 161.483,49.657 161.483,82.671 cw(c165.025,82.671) 165.025,86.213 181.668,86.213 ccw(c181.668,93.698) 189.154,93.698 R102.2@189.154,112.116
  Bottom Layer w1: R48.1@161.036,47.117 L7.4@165.1,47.117
DCM: R89.1 R100.2 U16.12 | length 3.3
  Top Layer w0.35: R89.1@172.11,118.697 R100.2@173.491,118.697 U16.12@173.491,120.613
EA+: D22.2 D24.2 R86.2 U16.2 | length 48.3
  Top Layer w0.35: R86.2@170.214,127.563 v2(171.271,127.563) 171.721,127.113 U16.2@173.491,127.113
  Top Layer w0.5: D24.2@203.138,132.816 v2(203.138,131.369) 211.231,131.369 ccw(c211.231,132.124) 211.987,132.124 D22.2@211.987,132.829
  Bottom Layer w0.4: v2(171.271,127.563) 190.784,127.563 194.59,131.369 v2(203.138,131.369)
EARTH: C1.1 C2.1 C9.2 C10.2 J2.2 J11.1 | length 373.8
  Bottom Layer w2: -0.914,94.285 -0.914,179.656 ; -0.914,180.696 -0.914,179.656 ; J11.1@264.22,202.268 261.97,202.268 261.22,203.018 261.22,203.413 259.693,204.94 11.959,204.94 ccw(c11.959,201.21) 8.23,201.21 8.23,192.448 cw(c4.377,192.448) 4.377,188.595 1.626,188.595 ccw(c1.626,186.055) -0.914,186.055 -0.914,179.656
Gate-A: D21.3 R56.1 U15.5 | length 6.5
  Top Layer w0.32: U15.5@224.332,112.019 225.42,112.019 226.223,111.216 D21.3@227.392,111.216
  Top Layer w0.6: R56.1@227.392,108.077 D21.3@227.392,111.216
Gate-B: C48.1 D19.3 U15.7 | length 11.7
  Top Layer w0.32: D19.3@219.264,111.216 220.906,111.216 221.259,111.569
  Top Layer w0.34: 221.259,111.569 221.259,113.146 221.55,113.436 222.768,113.436 223.003,113.202 U15.7@223.003,112.019
  Top Layer w0.6: D19.3@219.264,111.216 219.264,108.49 219.892,107.862 C48.1@219.892,106.68
Gate-C: D20.3 R59.1 U14.5 | length 5.4
  Top Layer w0.508: U14.5@234.759,25.768 D20.3@237.562,25.768 ; R59.1@237.689,23.19 D20.3@237.689,25.768
Gate-D: C49.1 D18.3 U14.7 | length 10.1
  Top Layer w0.33: 232.338,27.442 233.006,27.442 cw(c233.006,27.086) 233.361,27.086 U14.7@233.361,25.768
  Top Layer w0.508: C49.1@230.105,21.877 ccw(c230.189,21.877) C49.1@230.189,21.793 230.189,23.614 ccw(c229.973,23.614) D18.3@230.126,23.768 230.126,26.492 cw(c231.076,26.492) 231.076,27.442 232.338,27.442
GND: C3.2 C4.2 C5.2 C6.2 C11.2 C12.1 C15.1 C21.1 C22.1 C23.2 C24.1 C25.1 C27.1 C28.1 C29.1 C31.1 C32.1 C33.1 C34.1 C35.1 C36.1 C37.1 C39.1 C50.2 C51.2 C52.2 C53.2 C54.2 C55.2 C56.2 C57.2 C103.1 C104.2 C105.1 C106.1 C108.2 D9.2 D10.1 D16.2 Designator111_1_2.1 Designator113.1 Designator113.2 J5.1 Q1.3 Q2.3 Q17.3 Q18.3 R3.1 R4.1 R5.2 R6.2 R7.2 R21.1 R37.2 R39.1 R44.1 R46.1 T1.11 T2.6 T3.6 U1.2 U1.4 U2.2 U2.4 U3.3 U6.3 U7.6 U8.3 U9.1 | length 28.3
  Top Layer w0.254: U6.3@137.366,120.185 v1@137.366,121.481 ; v1@140.455,121.481 140.455,120.249 C12.1@140.493,120.211
  Bottom Layer w0.5: C55.2@196.468,13.598 196.469,13.597 197.816,13.597 C57.2@197.817,13.596
  Bottom Layer w0.508: C34.1@107.478,195.936 cw(c107.478,195.898) 107.517,195.898 v1(107.517,193.878) ; C34.1@107.517,195.936 C35.1@107.517,197.434 ; R39.1@112.141,191.084 R39.1@112.166,191.084 ; C28.1@112.141,192.485 cw(c112.141,192.46) 112.166,192.46 R39.1@112.166,191.084 ; C27.1@112.166,189.644 R39.1@112.166,191.084 ; C29.1@114.751,191.008 ccw(c114.675,191.008) 114.675,191.084 R39.1@112.166,191.084 ; C53.2@192.728,3.325 192.732,3.328 194.09,3.328 C51.2@194.093,3.332 ; C52.2@192.742,84.245 196.494,84.245 v4(196.494,84.252) ; C54.2@196.507,92.957 196.524,92.974 197.813,92.974 C56.2@197.831,92.992 197.894,92.992 198.318,92.568 Q18.3@206.331,92.568
  Bottom Layer w1.8: Q17.3@206.318,11.648 ccw(c206.434,11.648) Q17.3@206.434,11.532
  other v1: 169.824,76.606 172.465,76.606 175.106,76.606 169.824,79.247 172.465,79.247 175.106,79.247 169.824,81.888 172.465,81.888 175.106,81.888 169.824,95.505 172.465,95.505 175.106,95.505 169.824,98.146 172.465,98.146 175.106,98.146 169.824,100.787 172.465,100.787 175.106,100.787 169.824,103.428 172.465,103.428 175.106,103.428 169.824,106.069 172.465,106.069 175.106,106.069 137.366,121.328 140.455,121.328 120.245,134.239 122.886,134.239 125.527,134.239 128.168,134.239 120.245,136.88 122.886,136.88 125.527,136.88 128.168,136.88 120.245,139.521 122.886,139.521 125.527,139.521 128.168,139.521 120.245,142.162 122.886,142.162 125.527,142.162 128.168,142.162 147.523,154.559 150.287,154.559 153.903,154.559 156.667,154.559 147.523,157.734 150.287,157.734 153.903,157.734 156.667,157.734 180.484,159.436 182.559,159.436 184.838,159.436 122.53,161.717 125.705,161.717 128.88,161.717 132.055,161.717 135.23,161.717 180.484,163.627 182.559,163.627 184.838,163.627 122.53,164.481 125.705,164.481 128.88,164.481 132.055,164.481 135.23,164.481 159.233,167.102 180.484,167.818 182.559,167.818 184.838,167.818 122.53,168.097 125.705,168.097 128.88,168.097 132.055,168.097 135.23,168.097 122.53,170.861 125.705,170.861 128.88,170.861 132.055,170.861 135.23,170.861 177.495,175.031 165.481,175.062 169.426,175.062 172.593,175.062 82.728,182.982 85.239,182.982 87.75,183.056 90.261,183.056 92.772,183.057 95.282,183.056 97.793,183.056 100.304,183.056 102.815,183.056 87.75,185.548 90.261,185.548 92.772,185.548 95.282,185.548 97.793,185.548 100.304,185.548 102.815,185.548 82.728,185.623 85.239,185.623 87.75,188.19 90.261,188.19 92.772,188.19 95.282,188.19 97.793,188.19 100.304,188.19 82.728,188.265 85.239,188.265 114.751,189.56 117.399,189.56 117.399,191.618 109.144,193.878
  other v2: 151.574,167.102 152.861,167.102 151.548,170.557 152.861,170.557
  other v3: 142.25,94.277 145.591,94.277
  other v4: 195.338,84.245
GND-S: C13.1 C14.1 C18.2 C19.1 C20.1 C38.2 C58.1 C59.1 C60.1 C61.2 C62.2 C63.2 C64.2 C65.2 C66.2 C67.1 C68.1 C69.1 C70.1 C71.1 C72.1 C73.1 C74.1 C75.1 C76.1 C77.1 C78.1 C79.1 C80.1 C81.1 C82.1 C83.1 C85.2 C88.1 C89.1 C91.1 C92.1 C93.1 C94.1 C95.1 C98.1 C99.1 C100.1 C101.1 C102.1 D18.1 D19.1 D20.1 D21.1 Designator111.1 J10.1 J12.2 J15.2 Q5.2 Q21.3 Q22.3 Q23.3 Q24.3 Q25.2 R12.1 R47.1 R77.2 R79.4 R93.1 R94.1 R95.1 R96.1 R97.1 R98.1 R99.1 R100.1 R103.2 R105.1 R109.1 R119.2 R120.1 T1.4 T1.6 U3.2 U4.3 U5.3 U10.3 U11.3 U11.9 U12.3 U12.9 U13.2 U14.3 U14.9 U15.3 U15.9 U16.24 U17.4 U18.2 U19.3 | length 101.9
  Top Layer w0.254: U14.9@233.686,23.568 cw(c233.686,23.243) U14.9@234.011,23.243
  Top Layer w0.33: U15.3@223.653,107.619 U15.9@223.653,109.494 ; U14.3@234.011,21.368 U14.9@234.011,23.243
  Top Layer w0.4: v2(222.085,158.445) U18.2@222.085,157.463 222.085,156.686 222.407,156.363 223.721,156.363 224,156.643 v1(224,157.463) ; U15.9@223.328,109.819 cw(c223.328,109.494) U15.9@223.653,109.494 ; C82.1@223.653,116.313 C83.1@226.442,116.313 ; C83.1@226.442,116.313 v1(227.95,116.313) ; D21.1@228.342,113.216 v1(230.175,113.216) ; C81.1@234.011,30.902 v1(238.639,30.902)
  Top Layer w0.6: R100.1@173.491,117.173 173.492,117.174 175.022,117.174 R105.1@175.023,117.175 ; v2(176.971,122.846) v2(176.971,124.429) v2(176.971,126.013) 176.971,127.232 178.047,128.308 179.289,128.308 179.536,128.06 ; R98.1@178.003,117.178 R99.1@179.536,117.178 ; 179.536,128.308 181.213,128.308 181.229,128.324 C89.1@181.229,128.854
  Top Layer w0.8: U4.3@134.953,125.113 134.953,128.087 136.412,129.546 146.027,129.546 147.091,130.61 147.091,133.579 146.464,134.206 ; U3.2@144.153,134.206 146.464,134.206 ; v1(175.768,139.929) 157.556,139.929 151.834,134.206 146.464,134.206
  Bottom Layer w0.33: U12.3@263.997,35.234 U12.9@265.872,35.234 ; U11.3@289.524,35.141 U11.9@291.399,35.141
  Bottom Layer w0.4: 299.44,165.144 cw(c299.44,164.842) 299.742,164.842 U13.2@299.742,163.052
  Bottom Layer w0.508: U11.9@291.399,35.141 cw(c291.399,34.816) U11.9@291.724,34.816
  Bottom Layer w0.6: v1@175.768,139.621 v1(175.768,139.929) 180.863,139.929 cw(c180.863,138.563) 182.228,138.563 J12.2@182.228,137.83
  other v1: 274.85,21.605 277.823,21.605 280.796,21.605 283.77,21.605 286.743,21.605 289.716,21.605 292.689,21.605 258.436,21.747 261.41,21.747 264.383,21.747 267.356,21.747 276.336,22.841 279.31,22.841 282.283,22.841 285.256,22.841 288.23,22.841 291.203,22.841 259.923,22.983 262.896,22.983 265.87,22.983 231.618,23.568 235.755,23.568 274.85,24.076 277.823,24.076 280.796,24.076 283.77,24.076 286.743,24.076 289.716,24.076 292.689,24.076 258.436,24.218 261.41,24.218 264.383,24.218 267.356,24.218 276.336,25.312 279.31,25.312 282.283,25.312 285.256,25.312 288.23,25.312 291.203,25.312 259.923,25.454 262.896,25.454 265.87,25.454 274.85,26.502 277.823,26.502 280.796,26.502 283.77,26.502 286.743,26.502 289.716,26.502 292.689,26.502 258.436,26.645 261.41,26.645 264.383,26.645 267.356,26.645 276.336,27.738 279.31,27.738 282.283,27.738 285.256,27.738 288.23,27.738 291.203,27.738 259.923,27.88 262.896,27.88 265.87,27.88 274.85,28.973 277.823,28.973 280.796,28.973 283.77,28.973 286.743,28.973 289.716,28.973 292.689,28.973 258.436,29.116 261.41,29.116 264.383,29.116 267.356,29.116 299.415,30.789 301.625,30.789 303.835,30.789 306.045,30.789 308.254,30.789 310.464,30.789 312.674,30.789 314.884,30.789 291.724,33.316 266.197,33.409 298.653,35.433 273.253,35.483 291.724,36.155 266.197,36.248 298.653,36.925 273.253,36.963 333.887,82.117 338.197,82.117 333.887,85.616 338.197,85.616 333.887,89.116 338.197,89.116 271.018,89.569 292.482,89.569 333.887,92.616 338.197,92.616 271.018,93.294 292.482,93.294 333.887,96.116 338.197,96.116 271.018,96.901 292.482,96.901 271.018,98.933 292.482,98.933 333.887,99.616 338.197,99.616 333.887,103.116 338.197,103.116 333.887,106.616 338.197,106.616 221.259,109.819 225.396,109.819 333.887,110.116 338.197,110.116 333.887,113.616 338.197,113.616 116.167,116.607 333.887,117.116 338.197,117.116 119.559,118.328 333.887,120.615 338.197,120.615 131.674,122.573 333.887,124.115 338.197,124.115 131.674,125.091 167.437,126.263 333.887,127.615 338.197,127.615 181.229,129.921 333.887,131.115 338.197,131.115 173.491,133.071 175.752,133.071 333.887,134.615 338.197,134.615 208.039,136.576 333.887,138.115 338.197,138.115 173.507,139.929 333.887,141.615 338.197,141.615 212.314,141.854 333.887,145.115 338.197,145.115 333.887,148.615 338.197,148.615 220.948,149.443 222.967,149.443 333.887,152.115 338.197,152.115 313.284,154.33 316.784,154.33 320.283,154.33 323.783,154.33 327.283,154.33 330.783,154.33 191.364,156.616 194.183,156.616 313.284,158.64 316.784,158.64 320.283,158.64 323.783,158.64 327.283,158.64 330.783,158.64 191.364,159.004 194.183,159.004
  other v2: 173.491,115.926 175.024,115.926 178.003,115.926 179.537,115.926 185.543,121.379 188.164,121.379 190.784,121.379
  other v4: 219.264,112.269 220.214,112.269
HV_IN: BR1.POS C107.2 D1.2 D4.1 L1.1
I_out: C86.1 J14.1 R82.2 R85.2 R112.2 U13.1 | length 145.3
  Top Layer w0.559: R112.2@199.314,137.287 199.314,132.896 ccw(c202.389,132.896) 202.389,129.821 222.78,129.821 ccw(c222.78,133.228) 226.187,133.228 226.187,141.885 ccw(c224.943,141.885) 224.943,143.129 J14.1@222.758,143.129
  Top Layer w0.8: R85.2@215.798,141.854 220.939,141.854 222.215,143.129 J14.1@222.758,143.129 ; J14.1@222.499,141.854 J14.1@222.758,142.113
  Bottom Layer w0.559: J14.1@222.758,143.129 231.201,151.572 231.201,159.421 235.659,163.879 286.89,163.879 287.463,163.306 R82.2@295.504,163.306 C86.1@297.148,163.306 298.771,163.306 298.792,163.286 U13.1@298.792,163.052
  other v1: 199.301,136.119
INRUSH_RLY: J6.1 NT1.2 Q4.3 R8.2
ISENSE_FB: BR1.NEG C107.1 R5.1 R6.1 R7.1 R30.1
NetBR1_AC1: BR1.AC1 K1.3 K1.4 RT1.2
NetBR1_AC2: BR1.AC2 C2.2 L4.3 VR1.2
NetC1_2: C1.2 C8.2 L3.3 L4.2
NetC7_1: C7.1 J4.1 L3.1
NetC8_1: C8.1 C9.1 L3.4 L4.1
NetC10_1: C10.1 K1.2 K1.5 L4.4 RT1.1 VR1.1
NetC13_2: C13.2 Q5.1 R8.1 R12.2
NetC14_2: C14.2 R14.1 U5.2
NetC15_2: C15.2 R19.1 R20.1 R21.2 U6.1
NetC16_1: C16.1 D6.1 R24.1
NetC16_2: C16.2 C108.1 R22.1 R23.2 R24.2 T1.7
NetC17_1: C17.1 C19.2 C20.2 D5.2 L5.1 R29.1
NetC17_2: C17.2 R25.2
NetC21_2: C21.2 C23.1 D9.1 Q7.3 R32.1 R35.2 U7.8
NetC22_2: C22.2 D8.3 R32.2
NetC24_2: C24.2 U9.2 | length 2.1
  Bottom Layer w0.508: C24.2@100.311,189.814 U9.2@102.456,189.814
NetC25_2: C25.2 D10.3 R30.2 U9.3 | length 13.8
  Bottom Layer w0.508: C25.2@100.311,191.084 103.74,191.084 ccw(c103.74,191.774) 104.43,191.774 104.43,194.203 ccw(c103.613,194.203) 103.613,195.021 D10.3@100.676,195.021 cw(c100.676,195.113) 100.584,195.113 R30.2@100.584,197.561
NetC26_1: C26.1 C30.2 U8.2 U10.2 | length 42.3
  Top Layer w1: U8.2@165.334,163.603 165.334,156.876 ccw(c167.978,156.876) 167.978,154.232 185.927,154.232 ccw(c185.927,156.824) 188.519,156.824 C30.2@188.519,162.62 ; C30.2@188.519,162.658 C26.1@190.602,162.658 ; U10.2@190.445,160.971 C26.1@190.445,162.501
NetC26_2: C26.2 R40.1 R43.2 R47.2 U10.1
NetC28_2: C28.2 R36.2 U9.5 | length 4.2
  Bottom Layer w0.508: U9.5@107.856,192.354 110.486,192.354 ccw(c110.486,192.485) C28.2@110.617,192.485 R36.2@110.617,193.878
NetC29_2: C29.2 R36.1 | length 2.8
  Bottom Layer w0.508: R36.1@112.141,193.878 114.421,193.878 cw(c114.421,193.548) C29.2@114.751,193.548
NetC30_1: C30.1 R43.1
NetC32_2: C32.2 U7.3 | length 6.4